# Altium PCB AT25256A.PcbDoc
Units mm, origin at the board's own origin, x right, y up, seen from the top; angles counter-clockwise.
Board outline 86 x 71 mm, 2 copper layers (Top Layer, Bottom Layer); 66 components, 57 nets, 306 pads, 108 vias.
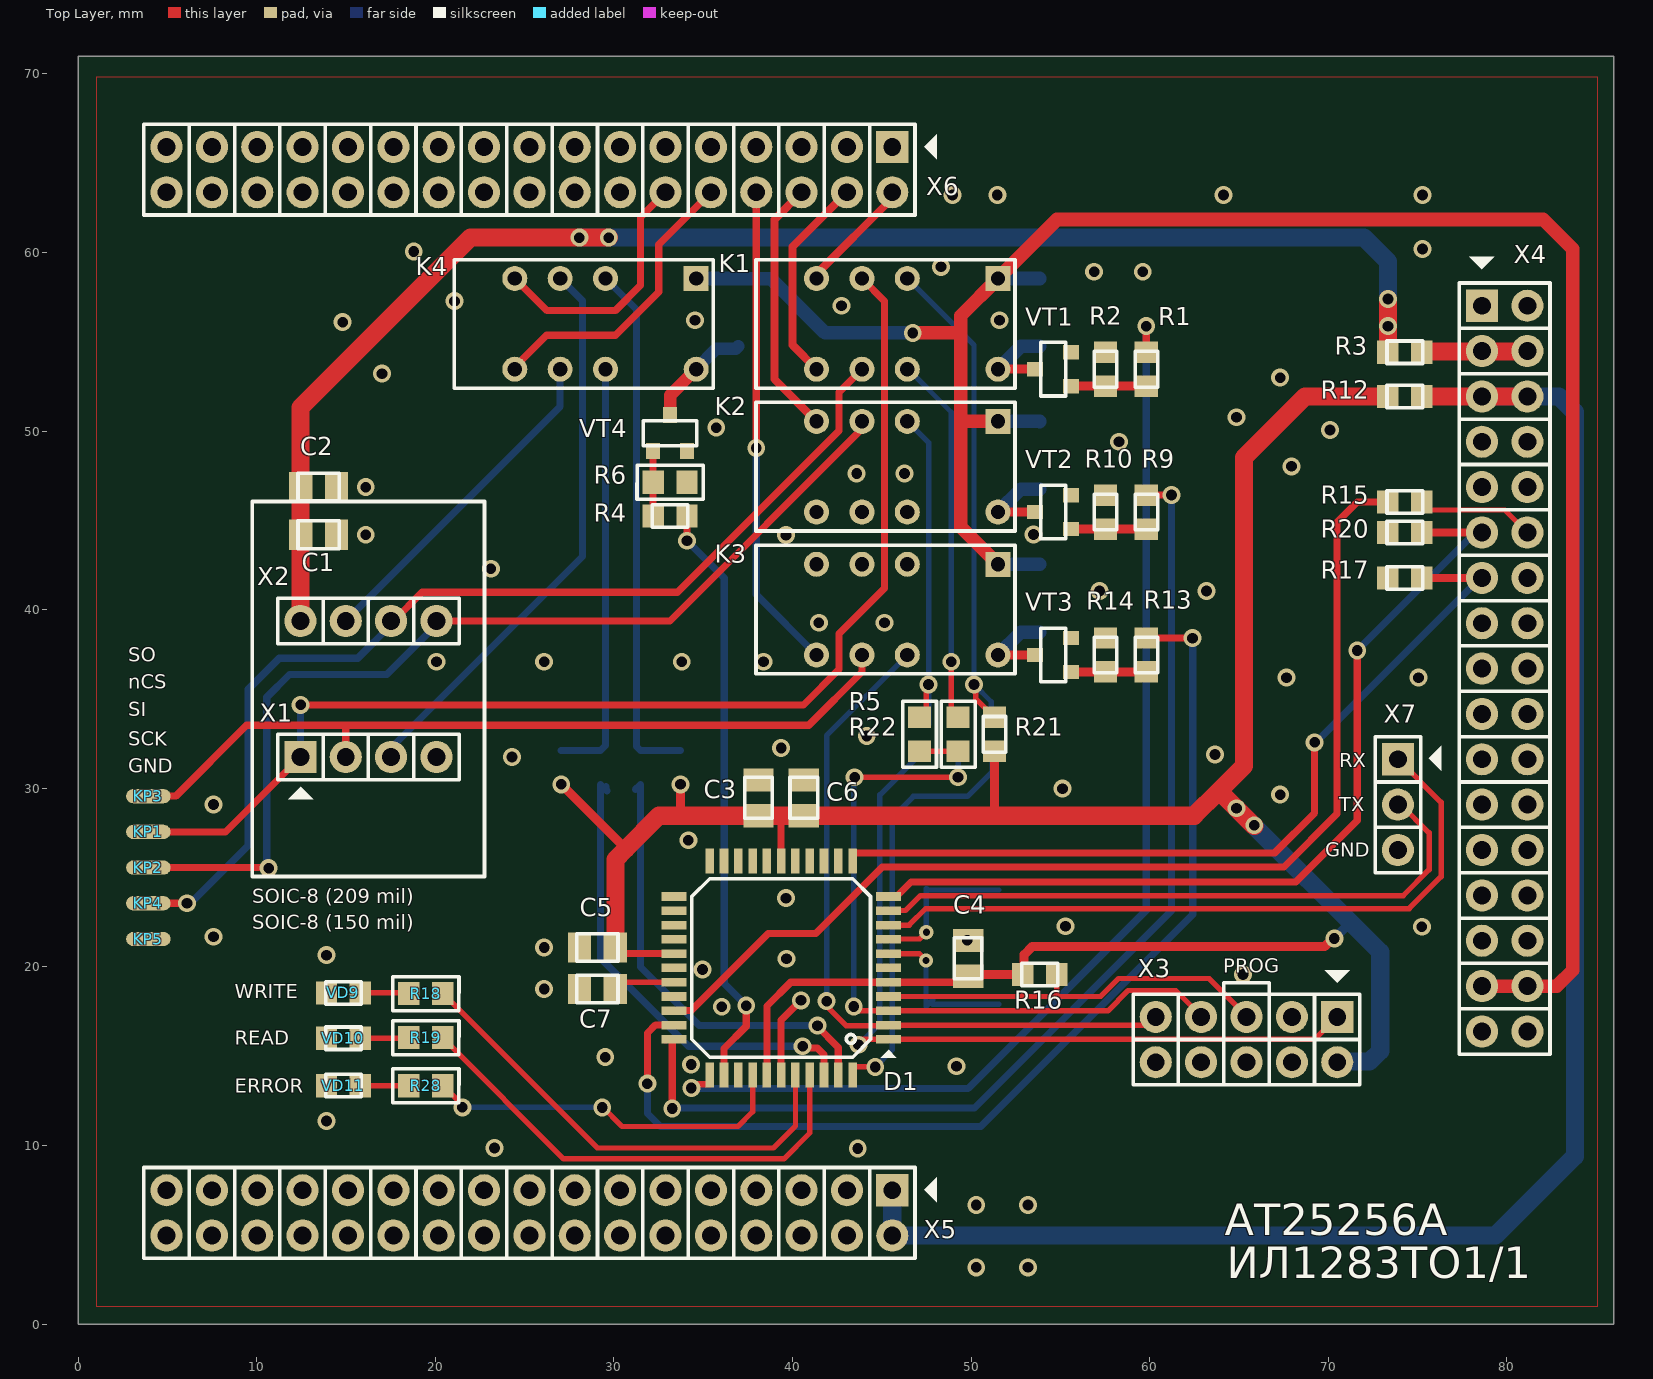
[diagram p0: Top Layer view]
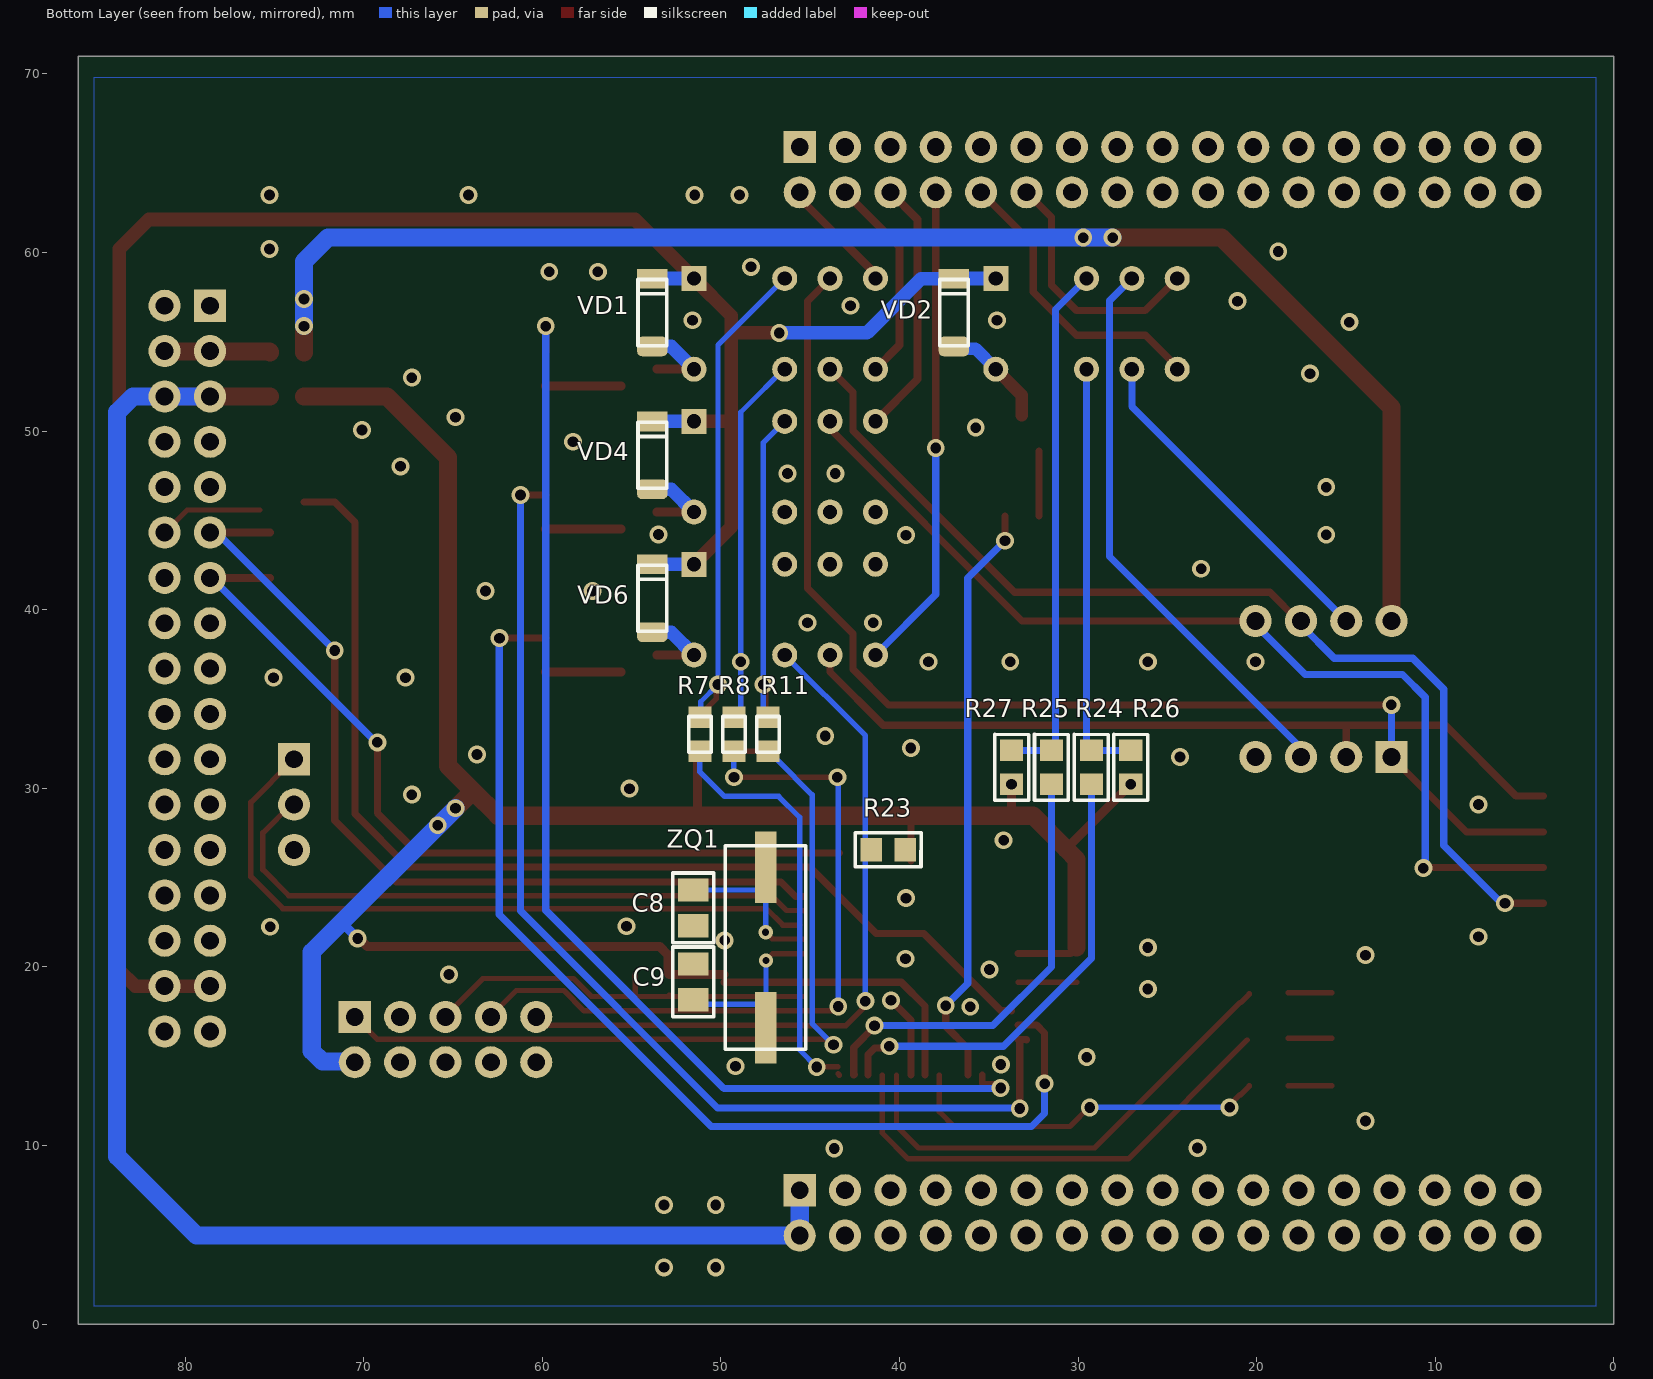
[diagram p1: Bottom Layer view, seen from below]
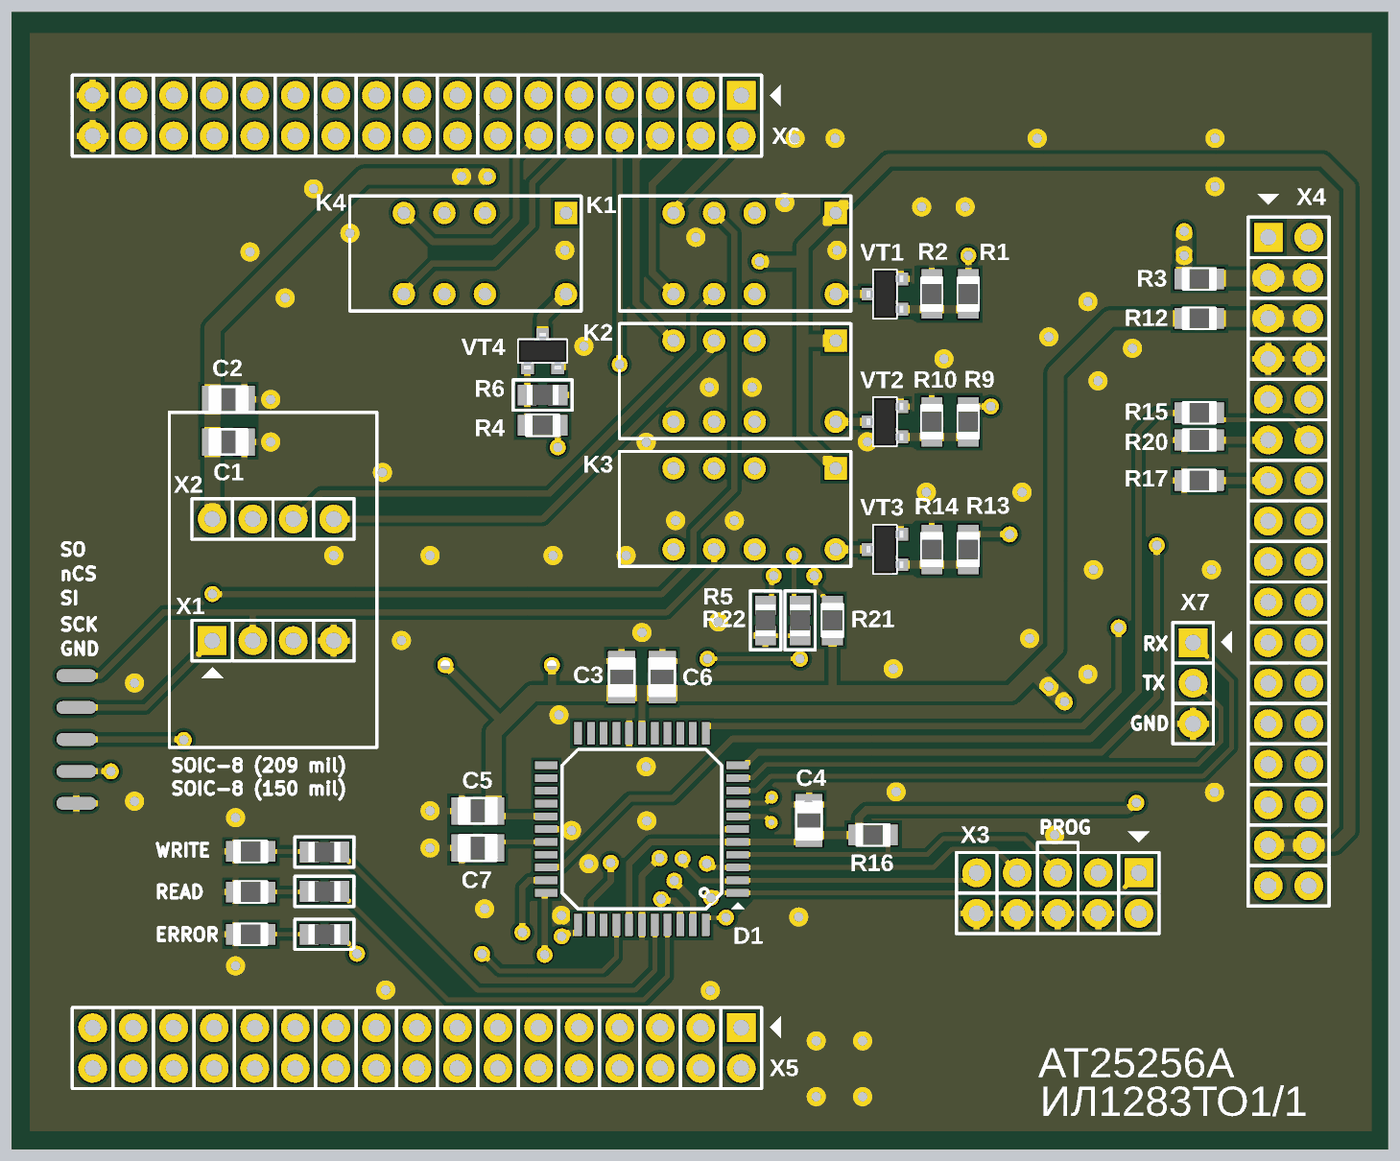
[diagram p2: 3D render of the assembled board from above, using the file's embedded part models]
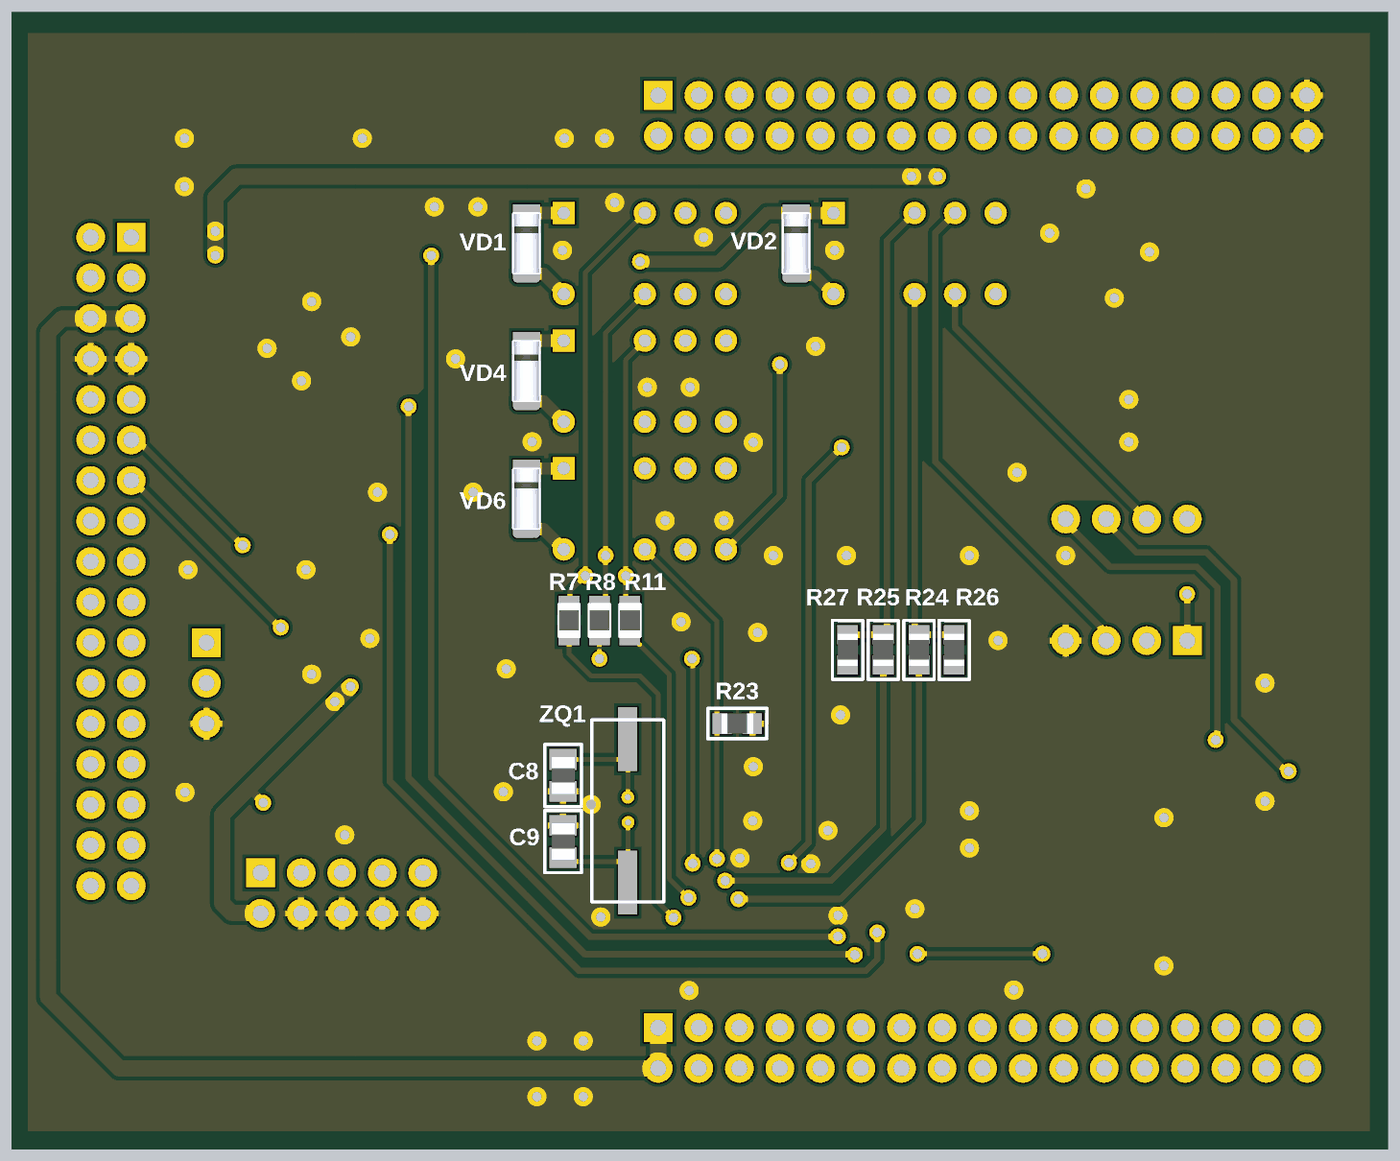
[diagram p3: 3D render of the assembled board from below, using the file's embedded part models]

## Layer stack, top to bottom
Top Solder: solder mask 0.0102, Solder Resist, Dk 3.5
Top Layer: signal copper 0.0356
Dielectric 1: core 0.32, FR-4, Dk 4.2
Bottom Layer: signal copper 0.0356
Bottom Solder: solder mask 0.0102, Solder Resist, Dk 3.5

## Board outline
0,0 86,0 86,71 0,71

## Design rules (kind name [scope] priority, off if disabled: settings)
AssemblyTestPointUsage [All] p1 off:
AssemblyTestpoint [All] p1 off: testpointundercomponent=TRUE minsize=1.016 maxsize=2.54 preferedsize=1.524 minholesize=0 maxholesize=1.016 preferedholesize=0.813 testpointgrid=0.025 usegrid=TRUE gridtolerance=0 allowsidetop=TRUE allowsidebottom=TRUE
Clearance "M3 Clearance" [IsPad and (not PadIsPlated) and Onlayer('Multi-Layer')] p1: gap=1 ignorepadtopadclearanceinfootprint=FALSE except(0: Arc-Hole Track-Hole SMDPad-Hole THPad-Hole Via-Hole Fill-Hole Poly-Hole Region-Hole Text-Hole; 0.5: Arc-THPad Track-THPad)
Clearance "Board Edge Clearance" [All vs OnLayer('Keep-out layer')] p2: gap=0.3 ignorepadtopadclearanceinfootprint=FALSE except(0: Arc-Hole Track-Hole SMDPad-Hole THPad-Hole Via-Hole Fill-Hole Poly-Hole Region-Hole Text-Hole)
Clearance "Poly Clearance" [InPolygon] p3: gap=0.254 ignorepadtopadclearanceinfootprint=FALSE except(0: Arc-Hole Track-Hole SMDPad-Hole THPad-Hole Via-Hole Fill-Hole Poly-Hole Region-Hole Text-Hole)
Clearance "Generic Clearance" [All] p4: gap=0.15 ignorepadtopadclearanceinfootprint=FALSE except(0: Arc-Hole Track-Hole SMDPad-Hole THPad-Hole Via-Hole Fill-Hole Poly-Hole Region-Hole Text-Hole)
ComponentClearance [All] p1 off: gap=0.254 collisioncheckmode=3 verticalgap=0.254 showdistances=FALSE
FabricationTestPointUsage [All] p1 off: valid=0 allowmultiple=FALSE
FabricationTestpoint [All] p1 off: side=3 testpointundercomponent=TRUE minsize=1.016 maxsize=2.54 preferedsize=1.524 minholesize=0 maxholesize=1.016 preferedholesize=0.813 testpointgrid=0.025 allowsidetop=TRUE allowsidebottom=TRUE usegrid=TRUE gridtolerance=0
Height [All] p1: minheight=0 maxheight=50.4 prefheight=12.7
HoleSize [All] p1: absolutevalues=TRUE maxlimit=10 minlimit=0.025 maxpercent=80.000 minpercent=20.000
MinimumAnnularRing "MinimumAnnularRing_Pad 1.6+" [PadIsPlated and (HoleSize > AsMM(1.6))] p1 off: minimumring=0.4
MinimumAnnularRing "MinimumAnnularRing_Pad 0.8-1.6" [PadIsPlated and (HoleSize > AsMM(1.1)) and (HoleSize <= AsMM(1.6))] p2 off: minimumring=0.275
MinimumAnnularRing "MinimumAnnularRing_Pad 0.4-0.7" [PadIsPlated and (HoleSize <= AsMM(1.1))] p3 off: minimumring=0.25
MinimumSolderMaskSliver [All] p1: minsoldermaskwidth=0.1
PlaneConnect [All] p1: planeconnectstyle=Relief reliefexpansion=0.508 reliefentries=4 reliefconductorwidth=0.508 reliefairgap=0.254
PolygonConnect PolygonConnect_1 [InNet('GND') AND IsVia] p1: connectstyle=Direct reliefconductorwidth=0.381 reliefentries=4 polygonreliefangle="90 Angle" airgapwidth=0.4
PolygonConnect [All] p2: connectstyle=Relief reliefconductorwidth=0.381 reliefentries=4 polygonreliefangle="90 Angle" airgapwidth=0.254
RoutingVias [All] p1: holewidth=1.2 width=1.2 viastyle="Through Hole" minholewidth=0.4 minwidth=0.8 maxholewidth=6 maxwidth=6
SilkToSilkClearance [All] p1 off: silktosilkclearance=0.254
SilkToSolderMaskClearance [IsPad vs Istext] p1: minsilkscreentomaskgap=0.1 clearancetoexposedcopper=TRUE
SolderMaskExpansion SolderMaskExpansion_Via [IsVia] p1: expansion=-2 istentingtop=FALSE
SolderMaskExpansion [All] p2: expansion=0.1 istentingtop=FALSE
Width [All] p1: maxlimit=1.016 minlimit=0.15 preferedwidth=0.508 minimp=50.000000 maximp=50.000000 favimp=50.000000
19 further rules are at their usual default settings.

## Classes and differential pairs
component class "Formula connector": X4 X5 X6

## Components (designator, comment, footprint, x,y, rotation, side; value= is the part's Value field where it differs from the comment)
C1 "A612 (0805) AVX" "0805 AVX" 13.462,44.196 r0 top value=0.1uF
C2 "A612 (0805) AVX" "0805 AVX" 13.462,46.863 r0 top value=10uF
C3 "A612 (0805) AVX" "0805 AVX" 38.1,29.464 r90 top value=10uF
C4 "A612 (0805) AVX" "0805 AVX" 49.837,20.48 r90 top value=0.1uF
C5 "A612 (0805) AVX" "0805 AVX" 29.083,21.082 r180 top value=0.1uF
C6 "A612 (0805) AVX" "0805 AVX" 40.64,29.464 r90 top value=0.1uF
C7 "A612 (0805) AVX" "0805 AVX" 29.083,18.758 r0 top value=0.1uF
C8 "A612 (0805) AVX" "0805 AVX" 51.555,23.304 r270 bottom value=22pF
C9 "A612 (0805) AVX" "0805 AVX" 51.555,19.162 r90 bottom value=22pF
D1 "ATMEGA16A-AU (TQFP-44)" 44-TQFP 39.37,19.939 r180 top locked
K1 "V23079A1001B301 TE" V23079A1001B301 45.212,56.007 r180 top
K2 "V23079A1001B301 TE" V23079A1001B301 45.212,48.006 r180 top
K3 "V23079A1001B301 TE" V23079A1001B301 45.212,40.005 r180 top
K4 "V23079A1001B301 TE" V23079A1001B301 28.314,56.007 r180 top locked
KP1 "Contplosh2.5x0.8" Plosh25x08 3.937,27.559 r180 top
KP2 "Contplosh2.5x0.8" Plosh25x08 3.937,25.559 r180 top
KP3 "Contplosh2.5x0.8" Plosh25x08 3.937,29.559 r180 top
KP4 "Contplosh2.5x0.8" Plosh25x08 3.937,23.559 r180 top
KP5 "Contplosh2.5x0.8" Plosh25x08 3.937,21.559 r180 top
R1 "4.7k" 0805 59.817,53.467 r270 top
R2 "20k" 0805 57.531,53.467 r90 top
R3 "0" 0805 74.295,54.417 r0 top
R4 "4.7k" 0805 33.147,45.243 r180 top
R5 "20k" 0805 51.308,33.02 r270 top
R6 "20k" 0805 33.147,47.143 r0 top
R7 "1k" 0805 51.181,33.02 r270 bottom
R8 "1k" 0805 49.276,33.02 r270 bottom
R9 "4.7k" 0805 59.817,45.466 r270 top
R10 "20k" 0805 57.531,45.466 r90 top
R11 "1k" 0805 47.371,33.02 r270 bottom
R12 "1" 0805 74.295,51.943 r180 top
R13 "4.7k" 0805 59.817,37.465 r270 top
R14 "20k" 0805 57.531,37.465 r90 top
R15 "2.2k" 0805 74.295,46.025 r180 top
R16 "10k" 0805 53.848,19.574 r180 top
R17 "10k" 0805 74.295,41.783 r0 top
R18 "1k" 0805 19.477,18.504 r180 top
R19 "1k" 0805 19.477,16.04 r180 top
R20 "10k" 0805 74.295,44.323 r0 top
R21 "20k" 0805 49.276,33.02 r270 top
R22 "20k" 0805 47.117,33.02 r270 top
R23 "20k" 0805 40.64,26.555 r0 bottom
R24 "1k" 0805 29.258,31.168 r270 bottom
R25 "1k" 0805 31.496,31.168 r270 bottom
R26 "20k" 0805 27.051,31.168 r270 bottom
R27 "20k" 0805 33.727,31.168 r270 bottom
R28 "1k" 0805 19.477,13.349 r180 top
VD1 "LL4148 NXP" SOD80C 53.848,56.642 r90 bottom
VD2 "LL4148 NXP" SOD80C 36.957,56.642 r90 bottom
VD4 "LL4148 NXP" SOD80C 53.848,48.641 r90 bottom
VD6 "LL4148 NXP" SOD80C 53.848,40.64 r90 bottom
VD9 "LED(0805)" 0805 14.859,18.542 r180 top
VD10 "LED(0805)" 0805 14.859,16.002 r180 top
VD11 "LED(0805)" 0805 14.859,13.349 r180 top
VT1 "MMBT5551L*G ONS" SOT-23 54.594,53.467 r90 top
VT2 "MMBT5551L*G ONS" SOT-23 54.594,45.466 r90 top
VT3 "MMBT5551L*G ONS" SOT-23 54.594,37.465 r90 top
VT4 "MMBT5551L*G ONS" SOT-23 33.147,49.892 r0 top
X1 "PLD4-2,54" PLD4-2,54#1 12.446,31.76 r0 top locked
X2 "PLD4-2,54" PLD4-2,54#2 12.446,39.38 r0 top locked
X3 "PLD10-2,54" PLD10-2,54 70.505,14.651 r180 top
X4 "PBS34-2,54" PBS34-2,54 78.613,57.023 r270 top locked
X5 "PBS34-2,54" PBS34-2,54 45.593,7.493 r180 top locked
X6 "PBS34-2,54" PBS34-2,54 45.593,65.913 r180 top locked
X7 "PLD3-2,54" PLD3-2,54 73.914,31.623 r270 top
ZQ1 "HC-49SM (16 MHz)" HC-49SM 47.505,21.083 r270 bottom

## Footprints (in the part's own frame and the unit in brackets; to place one, negate y for a bottom-side part, rotate by r counter-clockwise, add the part's x,y. Pads: shape width x height; smd on the part's side, far side on the other; paste and mask are expansions set on the pad)
44-TQFP [mm]
  rect 1.4x0.48 smd: 1(-6,4) 2(-6,3.2) 3(-6,2.4) 4(-6,1.6) 5(-6,0.8) 6(-6,0) 7(-6,-0.8) 8(-6,-1.6) 9(-6,-2.4) 10(-6,-3.2) 11(-6,-4) 23(6,-4) 24(6,-3.2) 25(6,-2.4) 26(6,-1.6) 27(6,-0.8) 28(6,0) 29(6,0.8) 30(6,1.6) 31(6,2.4) 32(6,3.2) 33(6,4)
  rect 0.48x1.4 smd: 12(-4,-6) 13(-3.2,-6) 14(-2.4,-6) 15(-1.6,-6) 16(-0.8,-6) 17(0,-6) 18(0.8,-6) 19(1.6,-6) 20(2.4,-6) 21(3.2,-6) 22(4,-6) 34(4,6) 35(3.2,6) 36(2.4,6) 37(1.6,6) 38(0.8,6) 39(0,6) 40(-0.8,6) 41(-1.6,6) 42(-2.4,6) 43(-3.2,6) 44(-4,6)
  silkscreen extent -5,-5 5,5
0805 [mm]
  rect 1.2x1.3 smd: 1(-0.95,0) 2(0.95,0)
  silkscreen extent -1,-0.63 1,0.63, body extent -1,-0.63 1,0.63, height 0.6
"0805 AVX" [mm]
  rect 1.3x1.7 smd: 1(-1,0) 2(1,0)
  silkscreen extent -1.15,-0.78 1.15,0.78, body extent -1.15,-0.73 1.15,0.72, height 1.29
HC-49SM [mm] "HC-49SM"
  rect 4x1.2 smd: 1(-4.5,0) 2(4.5,0)
  silkscreen extent -5.7,-2.25 5.7,2.25
PBS34-2,54 [mm]
  rect 1.8x1.8 hole 1: 1(0,0)
  round 1.8 hole 1: 2(2.54,0) 3(5.08,0) 4(7.62,0) 5(10.16,0) 6(12.7,0) 7(15.24,0) 8(17.78,0) 9(20.32,0) 10(22.86,0) 11(25.4,0) 12(27.94,0) 13(30.48,0) 14(33.02,0) 15(35.56,0) 16(38.1,0) 17(40.64,0) 18(0,2.54) 19(2.54,2.54) 20(5.08,2.54) 21(7.62,2.54) 22(10.16,2.54) 23(12.7,2.54) 24(15.24,2.54) 25(17.78,2.54) 26(20.32,2.54) 27(22.86,2.54) 28(25.4,2.54) 29(27.94,2.54) 30(30.48,2.54) 31(33.02,2.54) 32(35.56,2.54) 33(38.1,2.54) 34(40.64,2.54)
  silkscreen extent -1.27,-1.27 41.91,3.81
PLD3-2,54 [mm]
  rect 1.8x1.8 hole 1: 1(0,-0.01)
  round 1.8 hole 1: 2(2.54,-0.01) 3(5.08,-0.01)
  silkscreen extent -1.27,-1.28 6.35,1.26
PLD4-2,54#1 [mm]
  rect 1.8x1.8 hole 1: 1(0,-0.01)
  round 1.8 hole 1: 2(2.54,-0.01) 3(5.08,-0.01) 4(7.62,-0.01)
  silkscreen extent -1.27,-1.28 8.89,1.26
PLD4-2,54#2 [mm]
  round 1.8 hole 1: 1(0,-0.01) 2(2.54,-0.01) 3(5.08,-0.01) 4(7.62,-0.01)
  silkscreen extent -1.27,-1.28 8.89,1.26
PLD10-2,54 [mm]
  rect 1.8x1.8 hole 1: 1(0,-2.55)
  round 1.8 hole 1: 2(0,-0.01) 3(2.54,-2.55) 4(2.54,-0.01) 5(5.08,-2.55) 6(5.08,-0.01) 7(7.62,-2.55) 8(7.62,-0.01) 9(10.16,-2.55) 10(10.16,-0.01)
  silkscreen extent -1.27,-4.45 11.43,1.26
Plosh25x08 [mm]
  oval 2.5x0.8 smd: 1(0,0)
  body extent -1.25,-0.4 1.25,0.4, height 0.01
SOD80C [mm]
  rrect50% 1.1x1.7 smd: 1(-1.9,0)
  rect 1.1x1.7 smd: 2(1.9,0)
  silkscreen extent -1.85,-0.8 1.85,0.8, body extent -1.85,-0.8 1.85,0.8, height 1.58
SOT-23 [mm]
  rect 0.8x0.9 smd: 1(-0.95,-1) 2(0.95,-1) 3(0,1)
  silkscreen extent -1.5,-0.7 1.5,0.7, body extent -1.5,-1.15 1.5,1.15, height 1.09
V23079A1001B301 [mm]
  rect 1.4x1.4 hole 0.8: 1(-6.3,-2.54)
  round 1.4 hole 0.8: 3(-1.22,-2.54) 4(1.32,-2.54) 5(3.86,-2.54) 8(3.86,2.54) 9(1.32,2.54) 10(-1.22,2.54) 12(-6.3,2.54)
  silkscreen extent -7.25,-3.6 7.25,3.6

## Part data
R1 R2 R3 R4 R5 R6 R7 R8 R9 R10 R11 R12 R13 R14 R15 R16 R17 R18 R19 R20 R21 R22 R23 R24 R25 R26 R27 R28: library part "RC0805 Yageo", ComponentHeigt=0.6, Firme=Yageo, KIND=Резистор, Leadform=SMD, Packaging=0805
ZQ1: library part HC-49SM
C1 C2 C3 C4 C5 C6 C7 C8 C9: ComponentHeigt=1.3, Firme=AVX, KIND=Конденсатор, Leadform=SMD, Packaging=0805
D1: Component Link=www.honeywell.com/radhard, KIND=Микросхема, Leadform="по чертежу", Note="Установка по чертежу"
K1 K2 K3 K4: ComponentHeigt=5.6, ComponentWeigt=2, KIND="Реле TQ2-SA-12V Panasonic", Leadform=SMD, NN=26100248, Packaging="SA type"
VD1 VD2 VD4 VD6: Component Link=http://www.nxp.com, ComponentHeigt=1.6, Firme=NXP, KIND="Диод LL4148 NXP", Leadform=SMD, NN=24009301, Packaging=SOD-80C
VD9 VD10 VD11: ComponentHeigt=0.75, Firme=Kingbright, KIND="Светодиод L-1154GD Kingbright", Leadform="в отверстия", NN=24003000
VT1 VT2 VT3 VT4: ComponentHeigt=1.1, Firme=ONS, KIND="Транзистор MMBT5551L*G ONS", Leadform=SMD, NN=24007468, Packaging=SOT-23
X1 X2 X3 X4 X5 X6 X7: ComponentHeigt=5.5, Name=Вилка, Specification="Вилка PLD2-2 *", Typ=PLD2-2

## Via types
v1: diameter 1, hole 0.6, Top Layer to Bottom Layer, 106 vias
v2: diameter 0.8, hole 0.4, Top Layer to Bottom Layer, 2 vias

## Nets (pads, with @x,y where several pads share a name; then routed paths per layer and width w, separated by ;. In a path a pad name is that pad's centre, name@x,y a point inside that pad or via, vN(x,y) a via of type N, cw(c..) or ccw(c..) an arc to the next point about the centre after c; other vN are vias at no path point)
+5V_CONST: K1.1 K2.1 K3.1 K4.1 VD1.2 VD2.2 VD4.2 VD6.2 X4.16 X4.33 | length 123
  Top Layer w0.762: v1(46.736,55.499) 49.426,55.499 ; K3.1 49.426,44.631 49.426,50.546 ; K2.1 49.426,50.546 ; X4.16 X4.33 82.804,18.923 83.693,19.812 83.693,60.198 82.042,61.849 54.814,61.849 K1.1 49.426,56.461 49.426,55.88 49.426,50.546
  Bottom Layer w0.762: K4.1 36.952,58.547 VD2.2 38.787,58.542 41.83,55.499 v1(46.736,55.499) ; K3.1 51.514,42.543 53.846,42.543 VD6.2 ; K2.1 51.514,50.544 53.846,50.544 VD4.2 ; K1.1 51.514,58.545 53.846,58.545 VD1.2
+5V_MC: C3.1 C4.1 C5.1 C6.1 D1.5 D1.17 D1.27 D1.38 R5.2 R12.2 R16.2 R26.2 R27.2 X3.2 | length 146.6
  Top Layer w0.4: C5.1 30.426,20.739 D1.27 ; D1.38 38.57,17.804 39.905,19.139 D1.5 C4.1@49.833,19.139 ; D1.17 39.37,28.464
  Top Layer w0.508: v1(27.051,30.218) 30.667,26.603 ; 33.617,28.464 33.727,28.574 v1(33.727,30.218) ; C4.1@49.837,19.574 R16.2 52.979,19.655 52.979,20.688 53.431,21.14 69.803,21.14 70.209,21.546 v1@70.304,21.546 ; 51.308,28.464 R5.2
  Top Layer w1.016: C5.1 30.083,26.019 30.667,26.603 32.528,28.464 33.617,28.464 39.37,28.464 41.91,28.464 51.308,28.464 62.5,28.464 63.889,29.853 ; v1@65.857,27.884 64.864,28.878 63.889,29.853 ; R12.2 68.707,51.943 65.278,48.514 65.278,31.242 63.889,29.853
  Bottom Layer w0.508: v1(70.347,21.588) 71.223,22.465
  Bottom Layer w1.016: v1(64.864,28.879) 72.917,20.825 72.917,15.293 72.322,14.698 X3.2@70.618,14.698
  other v1: 65.857,27.927
+5V_MEM: C1.1 C2.1 R3.1 X2.1 | length 85.6
  Top Layer w1.016: X2.1@12.454,39.37 12.454,45.585 ; 12.462,45.593 C2.1 12.462,51.31 21.985,60.833 v1(28.067,60.833) 29.591,60.833 v1(29.718,60.833) ; R3.1 v1(73.345,55.88) v1(73.345,57.404)
  Bottom Layer w1.016: v1(28.067,60.833) 37.465,60.833 72.009,60.833 73.345,59.497 v1(73.345,57.404) v1(73.345,55.88)
+5V_VCC: R3.2 X4.2 X4.19 | length 5.9
  Top Layer w1.016: R3.2 75.278,54.45 81.12,54.45 X4.19
+5V_VDD: R12.1 X4.3 X4.20 X5.1 X5.18 | length 95.7
  Top Layer w1.016: R12.1 X4.3 X4.20
  Bottom Layer w1.016: X5.1 X5.18 79.375,4.953 83.82,9.398 83.82,51.054 82.931,51.943 X4.20 X4.3
CS: K1.4 KP1.1 X1.1 | length 67.6
  Top Layer w0.4: KP1.1 8.255,27.559 X1.1 ; v1(12.462,34.671) 40.612,34.671 42.61,36.669 42.61,38.651 45.161,41.201 45.161,44.836 45.161,57.278 K1.4
  Bottom Layer w0.4: X1.1 12.446,34.655 v1(12.462,34.671)
CS_F: K1.5 X6.18 | length 6.6
  Top Layer w0.45: K1.5 41.352,58.804 45.593,63.045 X6.18
CS_MC: D1.44 R7.2 | length 23.5
  Top Layer w0.3: D1.44 D1.44@43.448,14.017 ; D1.44@43.448,14.398 v1(44.641,14.398)
  Bottom Layer w0.3: v1(44.641,14.398) 45.591,15.348 45.591,28.369 46.769,29.547 49.806,29.547 51.181,30.923 R7.2
DI1_MC: R15.1 X4.23 | length 5.9
  Top Layer w0.3: R15.1@75.819,45.586 79.89,45.586 X4.23
DO1_MC: D1.11 R20.2 X4.6 | length 50.6
  Top Layer w0.4: D1.11 45.824,23.939 46.643,24.758 68.185,24.758 71.628,28.201 v1(71.628,37.719)
  Top Layer w0.45: R20.2 X4.6
  Bottom Layer w0.4: v1@71.683,37.774 78.232,44.323 X4.6
DO2_MC: D1.12 R17.2 X4.7 | length 47.3
  Top Layer w0.4: D1.12@43.37,26.386 67.008,26.386 69.244,28.621 v1(69.244,32.573)
  Top Layer w0.45: R17.2 X4.7
  Bottom Layer w0.4: v1@69.244,32.512 X4.7@78.515,41.783
  Bottom Layer w0.45: X4.7@78.515,41.783 X4.7
GND: C1.2 C2.2 C3.2 C4.2 C5.2 C6.2 C7.1 C8.2 C9.2 D1.6 D1.18 D1.28 D1.39 KP5.1 R2.2 R6.2 R10.2 R14.2 R17.1 R20.1 R21.2 R22.2 R23.1 VD9.2 VD10.2 VD11.2 VT1.2 VT2.2 VT3.2 VT4.2 X1.4 X3.4 X3.6 X3.8 X3.10 X4.4 X4.21 X6.17 X6.34 X7.3 | length 6.8
  Top Layer w0.3: R22.2 R21.2
  Top Layer w0.4: D1.39 39.37,17.02 v1(40.476,18.126)
  other v1: 50.292,3.175 53.197,3.175 50.292,6.67 53.197,6.67 43.657,9.828 23.315,9.856 13.909,11.372 49.191,14.433 34.33,14.53 29.515,14.944 36.04,17.767 26.096,18.758 65.235,19.574 34.959,19.851 39.673,20.457 13.909,20.657 26.096,21.089 49.796,21.483 7.578,21.686 75.245,22.248 55.296,22.278 39.634,23.85 34.173,27.094 7.578,29.096 67.311,29.644 55.118,29.98 24.301,31.757 63.66,31.886 39.37,32.26 44.163,32.924 67.664,36.194 75.057,36.194 20.066,37.084 26.096,37.084 33.801,37.084 38.38,37.084 41.48,39.269 45.161,39.269 57.191,41.05 63.187,41.05 23.114,42.291 39.637,44.175 16.11,44.196 53.497,44.207 16.11,46.863 43.595,47.625 46.277,47.625 67.945,48.027 58.293,49.403 70.104,50.065 35.734,50.197 64.864,50.779 67.311,52.995 17.018,53.218 14.812,56.104 34.543,56.21 51.593,56.21 42.752,57.023 21.074,57.278 56.896,58.928 59.62,58.928 48.322,59.198 18.796,60.064 75.278,60.198 48.968,63.222 51.474,63.222 64.135,63.222 75.278,63.222
LED1_MC: D1.40 R18.1 | length 26.7
  Top Layer w0.3: R18.1 20.427,18.454 20.877,18.004 20.932,18.004 29.081,9.856 38.939,9.856 40.17,11.087 D1.40
LED2_MC: D1.41 R19.1 | length 27
  Top Layer w0.3: R19.1@20.537,15.903 27.188,9.252 39.524,9.252 40.97,10.698 D1.41
LED3_MC: D1.37 R28.1 | length 20.9
  Top Layer w0.3: R28.1 20.427,13.299 20.877,12.849 20.927,12.849 21.59,12.186 v1@21.59,12.065 ; v1@29.321,12.198 30.461,11.058 36.941,11.058 37.77,11.887 D1.37
  Bottom Layer w0.3: v1(21.517,12.132) v1@29.352,12.132
  other v1: 29.352,12.122
MI: K2.4 KP2.1 X2.4 | length 56.4
  Top Layer w0.4: KP2.1 v1@10.668,25.559 ; X2.4 33.144,39.37 K2.4@43.971,50.197 ; K2.4@43.892,50.275 K2.4
  Bottom Layer w0.4: v1(10.668,25.527) 10.56,25.635 10.56,35.098 11.842,36.379 17.286,36.379 20.066,39.16 X2.4
MI_F: K2.5 X6.20 | length 14.4
  Top Layer w0.45: X6.20 38.989,61.849 38.989,52.909 K2.5
MI_MC: D1.2 K3.10 R23.2 X3.9 | length 40.6
  Top Layer w0.3: v1@41.736,17.983 43.021,16.699 45.33,16.699 D1.2 X3.9@60.579,16.739
  Bottom Layer w0.3: v1(41.917,18.08) 41.917,32.95 K3.10
MO: K3.9 KP3.1 X1.2 | length 45.6
  Top Layer w0.4: KP3.1 5.465,29.559 9.434,33.528 14.986,33.528 ; X1.2 14.986,33.528 ; K3.9 43.892,36.507 40.913,33.528 14.986,33.528
MO_F: K3.8 X6.21 | length 27.3
  Top Layer w0.4: v1(37.973,49.057) X6.21
  Bottom Layer w0.4: v1(37.973,49.057) 37.973,40.844 K3.8
MO_MC: D1.1 R11.2 X3.1 | length 45.2
  Top Layer w0.3: v1@43.815,15.939 D1.1 69.244,15.939 X3.1
  Bottom Layer w0.3: v1(43.699,15.637) 44.896,16.833 44.896,29.636 46.871,31.611 46.871,31.62 47.117,31.866 R11.2@47.471,31.866
NetC7_2: C7.2 D1.29 | length 3.3
  Top Layer w0.3: C7.2@30.083,19.139 D1.29
NetD1_31: D1.31 R15.2 | length 61
  Top Layer w0.4: D1.31@33.727,17.539 33.752,17.564 34.333,17.564 38.641,21.872 41.303,21.872 45.032,25.601 67.519,25.601 70.485,28.567 70.485,44.882 71.628,46.025 R15.2
NetK1_3: K1.3 R5.1 R7.1 | length 28.9
  Top Layer w0.3: v1(50.165,35.814) 50.257,35.722 50.257,35.021 50.808,34.47 50.808,34.42 51.258,33.97 R5.1
  Bottom Layer w0.3: K1.3 50.165,54.814 v1(50.165,35.814) 51.135,34.844 51.135,34.016 R7.1
NetK1_10: K1.10 R8.1 R21.1 | length 24.3
  Top Layer w0.3: v1(48.892,37.084) 48.892,34.354 R21.1
  Bottom Layer w0.3: K1.10@46.228,53.721 48.892,51.057 v1(48.892,37.084) 48.892,34.354 R8.1
NetK1_12: K1.12 VD1.1 VT1.3 | length 4.9
  Top Layer w0.508: K1.12 VT1.3
  Bottom Layer w0.762: K1.12 52.787,54.742 VD1.1
NetK2_3: K2.3 R11.1 R22.1 | length 19.2
  Top Layer w0.3: R22.1@47.498,34.036 v1@47.498,35.814
  Bottom Layer w0.3: K2.3 47.625,49.353 v1(47.625,35.814) R11.1@47.625,33.589
NetK2_12: K2.12 VD4.1 VT2.3 | length 4.9
  Top Layer w0.508: K2.12 VT2.3
  Bottom Layer w0.762: K2.12 52.787,46.741 VD4.1
NetK3_12: K3.12 VD6.1 VT3.3 | length 4.9
  Top Layer w0.508: K3.12 VT3.3
  Bottom Layer w0.762: K3.12 52.787,38.74 VD6.1
NetK4_3: K4.3 R25.1 R27.1 | length 29.5
  Bottom Layer w0.4: K4.3 31.266,56.815 31.266,32.348 R25.1 R27.1
NetK4_10: K4.10 R24.1 R26.1 | length 23.7
  Bottom Layer w0.4: R26.1 R24.1 29.534,32.394 K4.10
NetK4_12: K4.12 VD2.1 VT4.3 | length 6.1
  Top Layer w0.7: VT4.3 33.147,52 K4.12
  Bottom Layer w0.7: K4.12 35.761,54.614 36.829,54.614 VD2.1
NetR1_2: R1.2 R2.1 VT1.1 | length 4.2
  Top Layer w0.508: VT1.1 R1.2
NetR4_2: R4.2 R6.1 VT4.1 | length 3.6
  Top Layer w0.4: R4.2 VT4.1
NetR9_2: R9.2 R10.1 VT2.1 | length 4.2
  Top Layer w0.508: VT2.1 R10.1 R9.2
NetR13_2: R13.2 R14.1 VT3.1 | length 4.2
  Top Layer w0.508: VT3.1 R14.1 R13.2
NetR18_2: R18.2 VD9.1 | length 2.4
  Top Layer w0.3: VD9.1 R18.2@18.227,18.542
NetR19_2: R19.2 VD10.1 | length 2.4
  Top Layer w0.3: VD10.1 R19.2@18.227,16.002
NetR28_2: R28.2 VD11.1 | length 2.4
  Top Layer w0.3: VD11.1 R28.2@18.227,13.349
nHOLD: K4.9 X2.2 | length 19.1
  Bottom Layer w0.4: X2.2 26.994,51.378 K4.9
nHOLD_F: K4.8 X6.22 | length 16.7
  Top Layer w0.4: K4.8 24.454,53.595 26.228,55.369 30.096,55.369 32.512,57.785 32.512,60.452 X6.22
nHOLD_MC: D1.42 R24.2 | length 26.2
  Top Layer w0.4: v1@40.665,15.46 41.392,15.46 41.77,15.082 D1.42
  Bottom Layer w0.4: R24.2@29.557,30.094 R24.2@29.557,29.919 ; R24.2@29.611,29.865 R24.2@29.557,29.919 ; v1(40.572,15.554) 34.187,15.554 29.258,20.483 R24.2 R24.2@29.557,29.919
nWP: K4.4 X1.3 | length 31.2
  Bottom Layer w0.4: X1.3@17.526,32.258 28.242,42.974 28.242,57.299 K4.4
nWP_F: K4.5 X6.23 | length 14.2
  Top Layer w0.4: K4.5 26.256,56.745 30.075,56.745 31.496,58.166 31.496,61.976 X6.23
nWP_MC: D1.43 R25.2 | length 25.2
  Top Layer w0.4: v1@41.373,16.682 42.57,15.485 D1.43 D1.43@42.53,13.979
  Bottom Layer w0.4: R25.2@31.203,29.925 R25.2 31.496,19.99 34.778,16.708 v1(41.4,16.708)
ON_RELE1: D1.34 R1.1 | length 65.5
  Top Layer w0.381: v1@34.339,13.095 v1@34.56,13.095 ; v1@34.339,13.429 35.32,13.429 35.37,13.479 D1.34
  Top Layer w0.4: R1.1 v1(59.817,55.88)
  Bottom Layer w0.4: v1@34.322,13.192 49.841,13.192 59.817,23.168 v1(59.817,55.88)
  other v1: 34.339,13.222
ON_RELE2: D1.33 R9.1 | length 61.3
  Top Layer w0.4: D1.33@32.893,15.922 32.91,15.939 D1.33 ; v1(33.274,12.065) D1.33@33.274,15.922 ; R9.1 v1@60.96,46.416
  Bottom Layer w0.4: v1@33.254,12.101 50.19,12.101 61.232,23.143 v1@61.232,46.414
  other v1: 61.232,46.422
ON_RELE3: D1.32 R13.1 | length 60.1
  Top Layer w0.4: v1(31.877,13.462) 31.877,16.294 32.322,16.739 D1.32 ; R13.1 v1@62.5,38.415
  Bottom Layer w0.4: v1(31.877,13.462) 31.877,11.793 32.606,11.063 50.549,11.063 62.418,22.933 62.418,38.395 v1(62.406,38.407)
ON_RELE4: D1.35 R4.1 | length 33.2
  Top Layer w0.4: v1(34.097,43.862) R4.1 ; D1.35 36.17,15.431 37.414,16.674 v1(37.414,17.829)
  Bottom Layer w0.4: v1(34.097,43.862) 36.179,41.78 36.179,19.064 v1(37.414,17.829)
RST_MC: D1.4 R16.1 X3.5 | length 22.6
  Top Layer w0.3: D1.4 52.959,18.339 ; 52.893,18.405 52.959,18.339 ; 54.798,18.405 R16.1 ; X3.5@65.405,17.272 63.332,19.345 58.264,19.345 57.258,18.339 52.959,18.339
RX_MC: D1.9 X7.1 | length 39.3
  Top Layer w0.3: D1.9@45.593,22.339 46.54,22.339 47.465,23.264 74.534,23.264 76.323,25.053 76.323,29.213 X7.1@73.987,31.549
SCK: K1.9 KP4.1 X2.3 | length 58.7
  Top Layer w0.4: KP4.1 v1(6.096,23.559) ; X2.3@17.653,39.37 19.261,40.978 33.566,40.978 40.851,48.262 42.607,50.019 42.607,52.182 K1.9
  Bottom Layer w0.4: v1(6.096,23.559) 6.287,23.559 9.525,26.797 9.525,35.545 11.264,37.284 15.661,37.284 17.526,39.149 X2.3
SCK_F: K1.8 X6.19 | length 11.7
  Top Layer w0.45: K1.8 40.005,54.814 40.005,60.325 X6.19
SCK_MC: D1.3 R8.2 X3.7 | length 40.7
  Top Layer w0.3: v1@43.307,17.539 D1.3 57.669,17.539 58.803,18.673 61.464,18.673 X3.7@62.865,17.272 ; v1(43.483,30.615) v1(49.276,30.615)
  Bottom Layer w0.3: v1(43.434,17.78) v1@43.434,30.615 ; v1(49.276,30.615) R8.2
TX_MC: D1.10 X7.2 | length 35.6
  Top Layer w0.3: D1.10 45.385,23.154 46.332,23.154 47.168,23.99 74.204,23.99 75.656,25.442 75.656,27.505 X7.2@74.035,29.126
XT1: C8.1 D1.8 ZQ1.1 | length 8.8
  Top Layer w0.3: D1.8 45.389,21.558 47.12,21.558 v2(47.501,21.939)
  Bottom Layer w0.3: v2(47.501,21.939) 47.501,24.384 47.58,24.304 C8.1
XT2: C9.1 D1.7 ZQ1.2 | length 9.1
  Top Layer w0.3: D1.7 47.1,20.739 v2(47.481,20.358)
  Bottom Layer w0.3: v2(47.481,20.358) 47.481,17.78 ZQ1.2@47.863,18.162 ; ZQ1.2@47.863,17.908 C9.1@51.555,17.908
pads on no net: D1.13 D1.14 D1.15 D1.16 D1.19 D1.20 D1.21 D1.22 D1.23 D1.24 D1.25 D1.26 D1.30 D1.36 K2.8 K2.9 K2.10 K3.3 K3.4 K3.5 X3.3 X4.1 X4.5 X4.8 X4.9 X4.10 X4.11 X4.12 X4.13 X4.14 X4.15 X4.17 X4.18 X4.22 X4.24 X4.25 X4.26 X4.27 X4.28 X4.29 X4.30 X4.31 X4.32 X4.34 X5.2 X5.3 X5.4 X5.5 X5.6 X5.7 X5.8 X5.9 X5.10 X5.11 X5.12 X5.13 X5.14 X5.15 X5.16 X5.17 X5.19 X5.20 X5.21 X5.22 X5.23 X5.24 X5.25 X5.26 X5.27 X5.28 X5.29 X5.30 X5.31 X5.32 X5.33 X5.34 X6.1 X6.2 X6.3 X6.4 X6.5 X6.6 X6.7 X6.8 X6.9 X6.10 X6.11 X6.12 X6.13 X6.14 X6.15 X6.16 X6.24 X6.25 X6.26 X6.27 X6.28 X6.29 X6.30 X6.31 X6.32 X6.33

## Polygon pours and split planes (outlines as drawn)
GND on Bottom Layer "Bottom Layer-No Net" (solid, remove dead copper, shelved, pour order 2): 1.016,69.83 1.016,0.996 85.09,0.996 85.09,69.83
GND on Top Layer "Top Layer-No Net 1" (solid, remove dead copper, shelved, pour order 0): 1.016,69.83 1.016,0.996 85.09,0.996 85.09,69.83

## Other copper
Top Layer:
  pour cut-out: 19.381,14.253 19.381,12.445 19.573,12.445 19.573,14.253
  pour cut-out: 19.381,16.944 19.381,15.136 19.573,15.136 19.573,16.944
  pour cut-out: 19.381,19.408 19.381,17.6 19.573,17.6 19.573,19.408
  pour cut-out: 14.404,14.253 14.404,12.445 15.287,12.445 15.287,14.253
  pour cut-out: 14.404,16.906 14.404,15.098 15.287,15.098 15.287,16.906
  pour cut-out: 2.458,21.749 2.458,21.368 2.788,21.368 2.801,21.382 2.801,21.767
  pour cut-out: 48.733,20.384 50.941,20.384 50.941,21.07 48.733,21.07
  pour cut-out: 72.74,29.083 72.75,29.093 72.75,30.469 74.485,30.469 74.534,30.419 74.534,29.213
  pour cut-out: 46.324,15.445 46.324,15.444 45.279,14.399 45.139,14.539 45.139,15.585 45.207,15.654
  pour cut-out: 39.905,19.139 42.183,19.139 43.053,18.269 43.053,16.446 41.138,14.532 41.138,14.53 39.438,14.53 38.57,15.398 38.57,17.804
  pour cut-out: 25.9,55.696 25.929,55.725 25.929,56.418 26.582,56.418 26.896,56.104 26.896,55.693
  pour cut-out: 17.526,38.206 20.066,38.206 20.066,39.37 17.526,39.37
  pour cut-out: 47.625,36.575 50.165,36.575 50.211,36.529 50.211,35.768 47.544,35.768 47.498,35.814
  pour cut-out: 43.053,64.537 45.593,64.537 45.593,63.373 43.411,63.373
  pour cut-out: 40.513,64.537 43.053,64.537 43.053,63.373 40.513,63.373 40.212,63.072
  pour cut-out: 37.973,64.537 40.513,64.537 40.513,63.373 37.973,63.373
  pour cut-out: 32.66,48.188 34.751,48.188 34.892,48.047 32.66,48.047
  pour cut-out: 32.851,49.596 33.793,49.596 33.793,48.188 32.851,48.188
  pour cut-out: 33.243,46.274 33.243,44.339 33.051,44.339 33.051,46.239
  pour cut-out: 33.652,48.047 33.652,46.274 33.086,46.274 33.051,46.239 33.051,48.047
  pour cut-out: 74.199,46.929 74.199,45.175 74.391,45.175 74.391,46.929
  pour cut-out: 13.366,43.092 13.558,43.092 13.558,44.895 13.552,44.901 13.376,44.901
  pour cut-out: 13.366,47.967 13.558,47.967 13.558,46.317 13.382,46.317 13.376,46.312
  pour cut-out: 50.18,32.512 50.404,32.512 50.404,31.216 50.18,31.216
  pour cut-out: 48.021,32.512 48.372,32.512 48.372,31.216 48.021,31.216
  pour cut-out: 46.213,33.116 52.212,33.116 52.212,32.512 46.213,32.512
  pour cut-out: 56.769,53.563 56.769,53.371 56.781,53.359 60.721,53.359 60.721,53.563
  pour cut-out: 58.435,55.271 58.435,53.035 58.913,53.035 58.913,55.271
  pour cut-out: 58.435,51.999 58.435,51.663 58.913,51.663 58.913,51.999
  pour cut-out: 56.298,51.863 56.298,51.999 56.627,51.999 56.627,51.663
  pour cut-out: 56.444,55.217 56.444,54.121 56.627,54.121 56.627,55.271
  pour cut-out: 56.298,43.862 56.298,43.998 56.627,43.998 56.627,43.662
  pour cut-out: 58.435,43.998 58.435,43.662 58.913,43.662 58.913,43.998
  pour cut-out: 58.435,47.27 58.435,45.034 58.913,45.034 58.913,47.27
  pour cut-out: 56.769,45.562 56.769,45.37 60.721,45.37 60.721,45.562
  pour cut-out: 56.444,47.216 56.444,46.12 56.627,46.12 56.627,47.27
  pour cut-out: 58.913,37.561 58.913,37.369 60.721,37.369 60.721,37.561
  pour cut-out: 58.435,39.269 58.435,37.033 58.913,37.033 58.913,39.269
  pour cut-out: 56.627,39.269 56.498,39.269 56.298,39.069 56.298,38.119 56.627,38.119
  pour cut-out: 58.435,35.661 58.435,35.997 58.913,35.997 58.913,35.661
  pour cut-out: 56.298,35.861 56.298,35.997 56.627,35.997 56.627,35.661
  pour cut-out: 52.89,54.121 52.89,52.813 56.405,52.813 56.769,53.177 56.769,54.121
  pour cut-out: 52.89,46.12 52.89,44.812 56.405,44.812 56.769,45.176 56.769,46.12
  pour cut-out: 52.89,38.119 52.89,36.811 56.405,36.811 56.769,37.175 56.769,38.119
  pour cut-out: 38.867,31.368 38.867,29.98 39.988,29.98 39.988,31.368
  pour cut-out: 36.996,29.98 36.996,29.368 41.744,29.368 41.744,29.98
  pour cut-out: 28.395,22.186 28.395,17.654 29.179,17.654 29.179,22.186
  pour cut-out: 45.3,14.083 45.3,16.307 44.421,16.307 42.956,14.842
  pour cut-out: 30.987,20.276 30.987,19.551 32.738,19.551 32.738,20.276
  pour cut-out: 53.752,20.478 53.752,18.751 53.944,18.751 53.944,20.478
  pour cut-out: 78.613,43.159 81.153,43.159 81.153,44.323 78.613,44.323
  pour cut-out: 14.404,19.446 14.404,17.638 15.287,17.638 15.287,19.446
  pour cut-out: 15.367,46.228 15.367,44.985 13.412,44.985 13.412,46.228
  pour cut-out: 11.558,45.759 11.558,45.3 11.685,45.3 11.685,45.727 11.784,45.825
  pour cut-out: 65.425,18.365 69.341,18.365 69.656,18.05 69.656,16.351 66.233,16.351 65.821,15.939
  pour cut-out: 74.391,42.687 74.391,40.879 73.776,40.879 73.776,42.687
  pour cut-out: 74.391,45.175 74.391,43.419 73.776,43.419 73.776,45.175
  pour cut-out: 74.199,52.847 74.391,52.847 74.391,51.039 74.199,51.039
  pour cut-out: 74.199,55.321 74.199,53.513 74.391,53.513 74.391,55.321
Bottom Layer:
  pour cut-out: 52.659,19.066 50.451,19.066 50.451,19.83 52.659,19.83
  pour cut-out: 50.451,23.4 52.659,23.4 52.659,22.637 50.451,22.637
  pour cut-out: 60.198,47.625 60.842,46.981 60.842,46.945 60.374,46.945 60.208,46.779
  pour cut-out: 61.232,47.183 59.817,47.183 59.817,46.815 60.448,46.184
  pour cut-out: 35.853,57.738 38.061,57.738 38.03,57.707 38.03,55.223 36.383,55.223 35.841,54.681
  pour cut-out: 28.569,42.646 28.587,42.646 29.4,43.459 28.667,44.191 28.442,44.191
  pour cut-out: 27.321,51.051 27.344,51.051 28.083,51.79 27.646,52.226 27.349,52.226
  pour cut-out: 49.273,51.214 49.282,51.214 50.222,50.274 49.252,49.304 49.182,49.304
  pour cut-out: 47.916,49.644 47.916,49.624 48.817,48.723 48,47.906 48,46.951
  pour cut-out: 31.033,19.99 31.028,19.985 31.028,18.717 32.207,18.717 32.385,18.895
  pour cut-out: 32.823,31.264 32.823,31.072 34.631,31.072 34.631,31.264
  pour cut-out: 30.592,31.264 30.592,31.072 32.4,31.072 32.4,31.264
  pour cut-out: 28.354,31.264 28.354,31.072 30.162,31.072 30.162,31.264
  pour cut-out: 26.147,31.264 26.147,31.072 27.955,31.072 27.955,31.264
  pour cut-out: 9.852,26.47 10.421,27.038 10.421,27.603 9.952,27.603 9.871,27.684
  pour cut-out: 17.526,40.534 20.066,40.534 20.066,39.37 17.225,39.37
  pour cut-out: 46.467,33.116 46.467,32.924 52.085,32.924 52.085,33.116
  pour cut-out: 54.962,39.015 54.952,39.025 54.952,43.344 52.744,43.344 52.744,38.697
  pour cut-out: 54.962,47.016 54.952,47.026 54.952,51.345 52.744,51.345 52.744,46.698
  pour cut-out: 54.962,55.017 54.952,55.027 54.952,59.346 52.744,59.346 52.744,54.699

## Silkscreen, mask and mechanical layers (free items; w line width, h text height)
Top Overlay:
  region: 76.334,32.372 76.334,30.972 75.634,31.672
  region: 13.162,29.399 11.762,29.399 12.462,30.099
  region: 45.823,14.922 44.95,14.922 45.386,15.358
  region: 48.071,66.613 48.071,65.213 47.371,65.913
  region: 77.913,59.755 79.313,59.755 78.613,59.055
  region: 48.085,8.225 48.085,6.825 47.385,7.525
  region: 69.805,19.806 71.205,19.806 70.505,19.106
  lines w0.2: 9.756,25.06 9.756,46.06 22.756,46.06 22.756,25.06 9.756,25.06
  text "SO" at 2.794,37.084 h0.8
  text "nCS" at 2.794,35.56 h0.8
  text "SI" at 2.794,34.036 h0.8
  text "SCK" at 2.794,32.385 h0.8
  text "RX" at 70.625,31.18 h0.8
  text "GND" at 2.794,30.861 h0.8
  text "TX" at 70.625,28.719 h0.8
  text "GND" at 69.826,26.179 h0.8
  text "SOIC-8 (209 mil)" at 9.756,23.559 h0.8
  text "SOIC-8 (150 mil)" at 9.756,22.11 h0.8
  text "PROG" at 64.134,19.667 h0.8
  text "WRITE" at 8.763,18.237 h0.8
  text "READ" at 8.763,15.626 h0.8
  text "ERROR" at 8.763,12.954 h0.8
  text "AT25256A" at 64.2,4.391 h3
  text "ИЛ1283ТО1/1" at 64.327,1.981 h3
Board:
  lines w0.127: -0.064,0 ccw(c0,0) 0,-0.064 ; -0.064,0 ccw(c0,0) 0,-0.064 ; -0.064,0 -0.064,71 ; -0.064,71 cw(c0,71) 0,71.064 ; -0.064,71 cw(c0,71) 0,71.064 ; 0,-0.064 86,-0.064 ; 0,71.064 86,71.064 ; 86,-0.064 ccw(c86,0) 86.064,0 ; 86,-0.064 ccw(c86,0) 86.064,0 ; 86,71.064 cw(c86,71) 86.064,71 ; 86,71.064 cw(c86,71) 86.064,71 ; 86.064,0 86.064,71 ; 0,0 0,71 86,71 86,0 0,0 ; 0.064,0.064 0.064,70.936 85.936,70.936 85.936,0.064 0.064,0.064